# Altium PCB photo_frame-v1.0.PcbDoc (part 5 of 5)
Units mil, origin at the board's own origin, x right, y up, seen from the top; angles counter-clockwise.
Board outline 27716.54 x 14566.93 mil, 2 copper layers (Top Layer, Bottom Layer), stack 61.811 mil thick; 261 components, 231 nets, 1061 pads, 959 vias.
Unrouted connection lines stored in the file: 10.
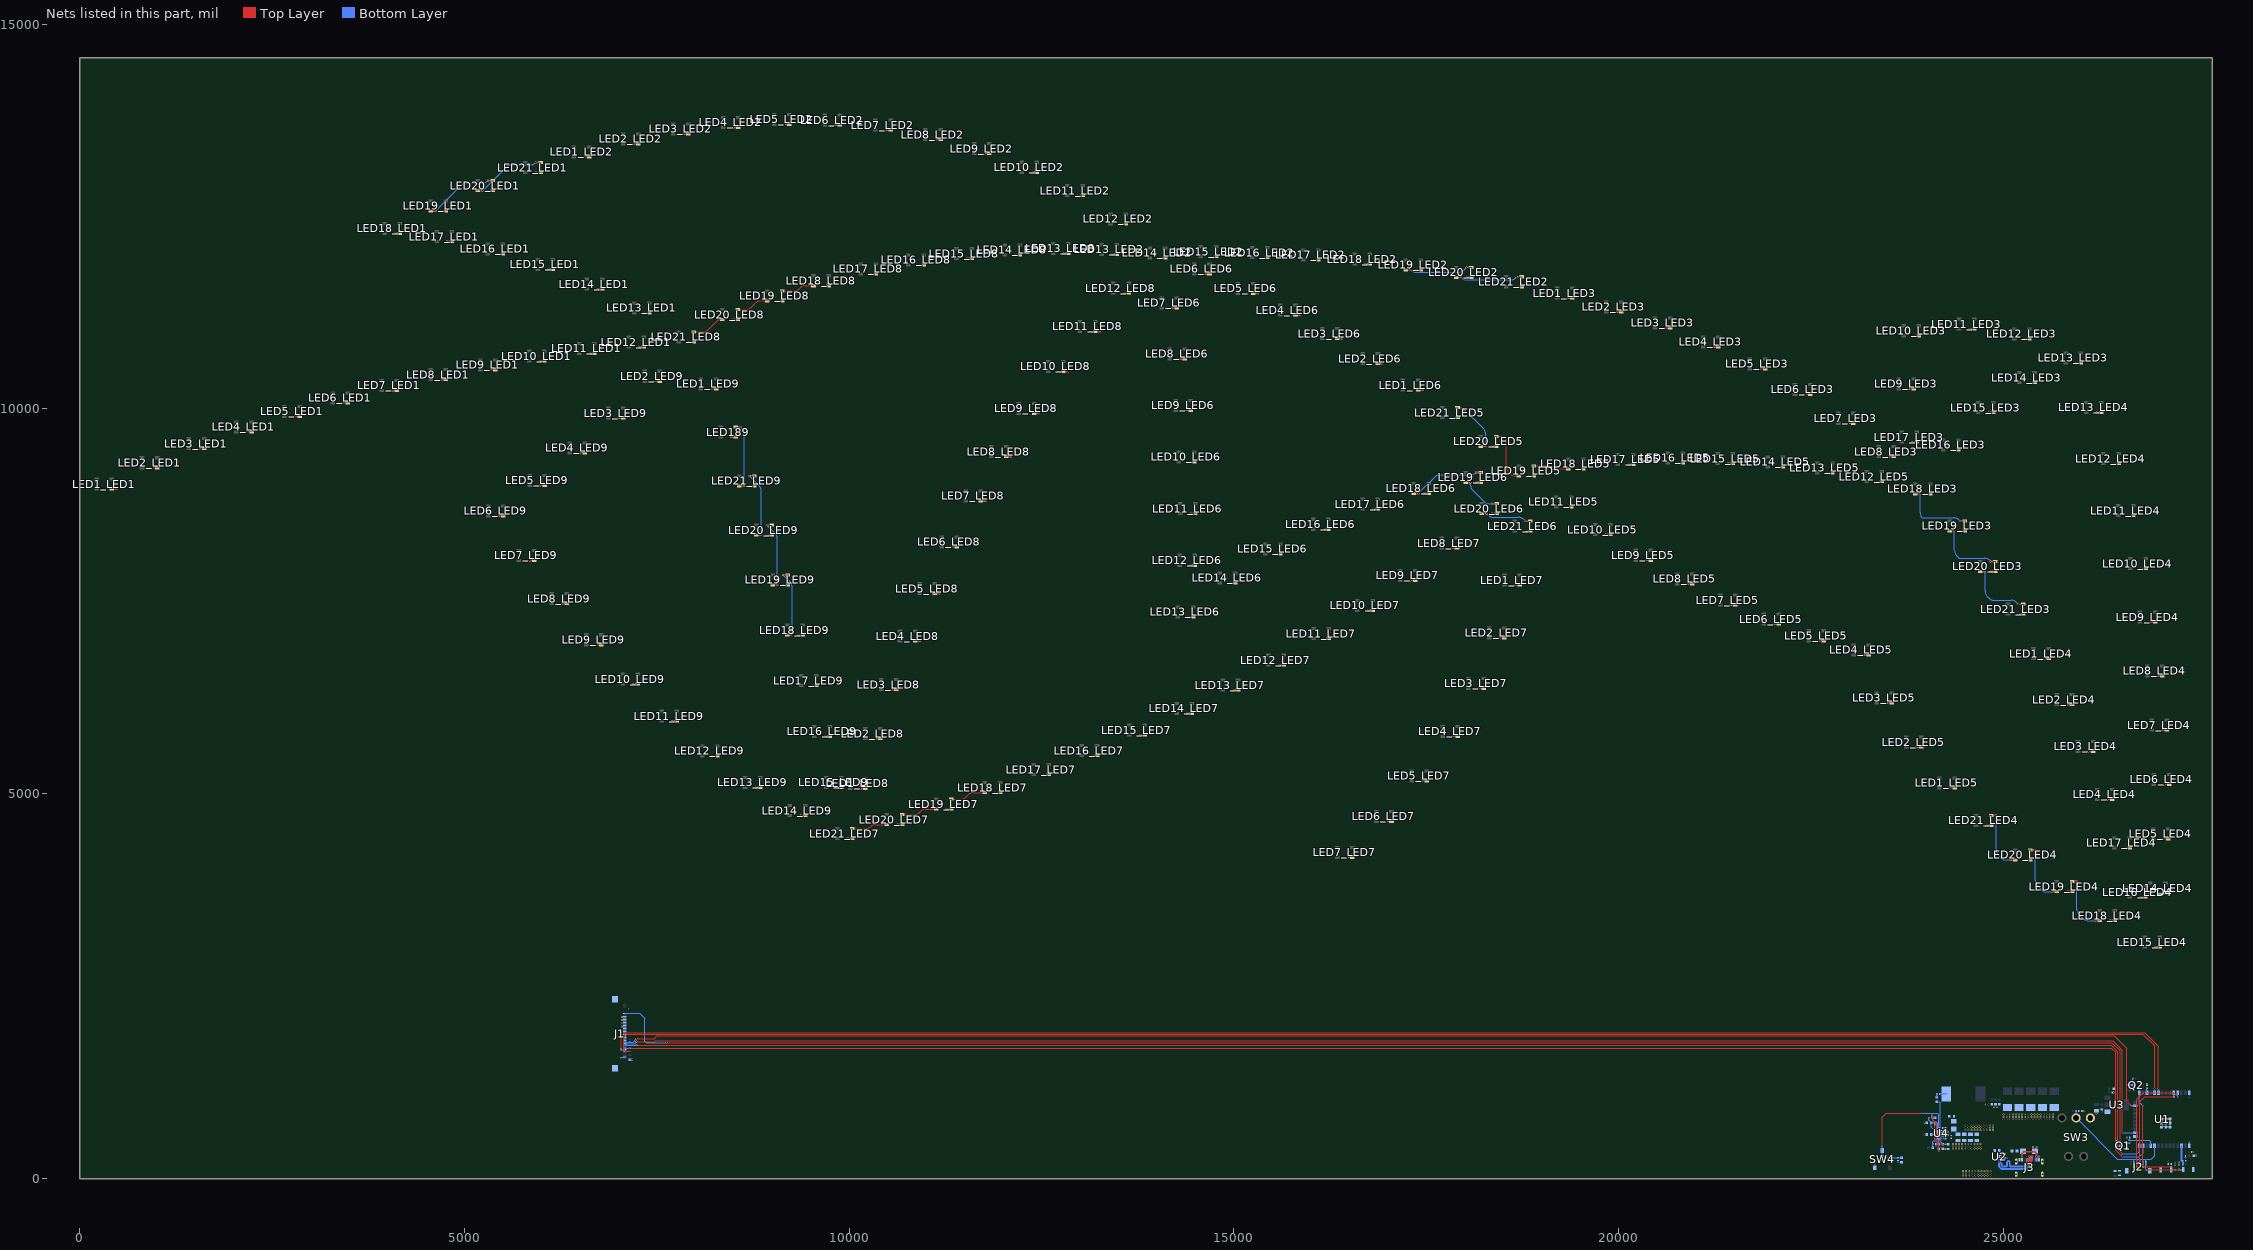
[diagram p4: the nets of this part, all layers, seen from the top]

## Via types
v1: diameter 23.62, hole 11.81, Top Layer to Bottom Layer, tented both sides, 729 vias
v2: diameter 23.62, hole 11.81, Top Layer to Bottom Layer, 230 vias

## Nets (pads, with @x,y where several pads share a name; then routed paths per layer and width w, separated by ;. In a path a pad name is that pad's centre, name@x,y a point inside that pad or via, vN(x,y) a via of type N, cw(c..) or ccw(c..) an arc to the next point about the centre after c; other vN are vias at no path point) (continued)
DOUT18_LED3: LED18_LED3.2 LED19_LED3.4 | length 946.3
  Top Layer w22: LED18_LED3.2@23853.45,8897.97 v1@23916.27,8897.97 ; v1@24435.36,8547.17 LED19_LED3.4@24498.18,8547.17
  Bottom Layer w12: v1(23916.27,8897.83) 23916.27,8649.29 ccw(c23997.29,8649.29) 23916.62,8641.76 ccw(c23997.29,8649.29) 23940,8592 ccw(c23959.31,8611.31) 23959.31,8584 24356.98,8584 cw(c24356.98,8484) 24427.69,8554.71 v1(24435.36,8547.04)
DOUT18_LED4: LED18_LED4.2 LED19_LED4.4 | length 798.1
  Top Layer w22: LED19_LED4.4@25892.06,3858.91 v1@25954.88,3858.91 ; v1@26189.89,3351.96 LED18_LED4.2@26252.71,3351.96
  Bottom Layer w12: v1(25954.88,3859.04) 25954.88,3497.54 ccw(c26054.88,3497.54) 25984.17,3426.83 26029.62,3381.38 ccw(c26100.33,3452.09) 26100.33,3352.09 v1(26189.89,3352.09)
DOUT18_LED5: LED18_LED5.2 LED19_LED5.4 | length 454.8
  Top Layer w12: LED19_LED5.4@18897.68,9260.08 19056.1,9260.08 cw(c19056.1,9188.1) 19107,9239 ccw(c19146.24,9278.24) 19146.24,9222.75 LED18_LED5.2@19342.46,9222.75
DOUT18_LED6: LED18_LED6.2 LED19_LED6.4 | length 976.3
  Top Layer w22: LED18_LED6.2@17335.69,8902.3 v1@17398.51,8902.3 ; v1@18144.72,9175.22 LED19_LED6.4@18207.54,9175.22
  Bottom Layer w12: v1(17398.51,8902.17) 17609.32,9112.97 cw(c17680.03,9042.26) 17680.03,9142.26 18070.47,9142.26 ccw(c18070.47,9242.26) 18141.19,9171.55 v1(18144.72,9175.09)
DOUT18_LED7: LED18_LED7.2 LED19_LED7.4 | length 464.2
  Top Layer w12: LED19_LED7.4@11328.54,4930.22 11459.59,4930.22 ccw(c11459.59,5011.41) 11463.16,4930.3 ccw(c11459.59,5011.41) 11517,4954 11548.01,4985.01 cw(c11618.72,4914.3) 11618.72,5014.3 LED18_LED7.2@11765.69,5014.3
DOUT18_LED8: LED18_LED8.2 LED19_LED8.4 | length 427.2
  Top Layer w12: LED19_LED8.4@9133.54,11533.22 9311.05,11533.22 ccw(c9311.05,11552.95) 9325,11539 9358.01,11572.01 cw(c9428.72,11501.3) 9428.72,11601.3 LED18_LED8.2@9537.69,11601.3
DOUT18_LED9: LED18_LED9.2 LED19_LED9.4 | length 955.6
  Top Layer w22: v1@9140.72,7844.22 LED19_LED9.4@9203.54,7844.22 ; LED18_LED9.2@9198.69,7060.3 v1@9261.51,7060.3
  Bottom Layer w12: v1(9140.72,7844.35) 9232.22,7752.85 cw(c9161.51,7682.14) 9261.51,7682.14 v1(9261.51,7060.17)
DOUT19_LED1: LED19_LED1.2 LED20_LED1.4 | length 961.6
  Top Layer w22: LED19_LED1.2@4564.68,12573.27 v1@4627.5,12573.27 ; v1@5309,12966.98 LED20_LED1.4@5371.82,12966.98
  Bottom Layer w12: v1(4627.5,12573.4) 4959.06,12904.97 cw(c5029.77,12834.26) 5029.77,12934.26 5234.72,12934.26 ccw(c5234.72,13034.26) 5305.43,12963.55 v1(5309,12967.12)
DOUT19_LED2: LED19_LED2.2 LED20_LED2.4 | length 888
  Top Layer w22: LED19_LED2.2@17231.17,11808.07 v1@17293.99,11808.07 ; v1@18024.83,11840.94 LED20_LED2.4@18087.65,11840.94
  Bottom Layer w12: v1(17293.99,11808.2) 17296.64,11805.55 ccw(c17367.35,11876.26) 17367.35,11776.26 17918.6,11776.26 ccw(c17918.6,11876.26) 17989.31,11805.55 v1(18024.83,11841.07)
DOUT19_LED3: LED19_LED3.2 LED20_LED3.4 | length 924.2
  Top Layer w22: LED19_LED3.2@24301.33,8417.25 v1@24364.15,8417.25 ; v1@24833.96,8018.87 LED20_LED3.4@24896.78,8018.87
  Bottom Layer w12: v1(24364.15,8417.12) 24364.15,8161.27 ccw(c24464.15,8161.27) 24384.28,8101.09 ccw(c24464.15,8161.27) 24393.44,8090.56 24411,8073 ccw(c24439.97,8101.97) 24439.97,8061 24750.27,8061 cw(c24750.27,7961) 24820.98,8031.71 v1(24833.96,8018.74)
DOUT19_LED4: LED19_LED4.2 LED20_LED4.4 | length 818.1
  Top Layer w22: LED20_LED4.4@25351.62,4270.24 v1@25414.44,4270.24 ; v1@25632.39,3728.99 LED19_LED4.2@25695.21,3728.99
  Bottom Layer w12: v1(25414.44,4270.37) 25414.44,3874.98 ccw(c25514.44,3874.98) 25443.73,3804.27 25510.31,3737.69 ccw(c25531,3758.39) 25531,3729.12 v1(25632.39,3729.12)
DOUT19_LED5: LED19_LED5.2 LED20_LED5.4 | length 726.3
  Top Layer w12: LED20_LED5.4@18407.97,9644.26 18482.75,9644.26 cw(c18482.75,9588.75) 18522,9628 cw(c18476.13,9582.13) 18541,9582.13 18541,9250.42 ccw(c18641,9250.42) 18570.29,9179.71 18590.55,9159.45 ccw(c18661.26,9230.16) 18661.26,9130.16 LED19_LED5.2@18700.83,9130.16
DOUT19_LED6: LED19_LED6.2 LED20_LED6.4 | length 554.2
  Top Layer w22: LED19_LED6.2@18010.69,9045.3 v1@18073.51,9045.3 ; v1@18354.72,8770.22 LED20_LED6.4@18417.54,8770.22
  Bottom Layer w12: v1(18073.51,9045.17) 18073.51,9014.91 ccw(c18173.51,9014.91) 18102.8,8944.2 18247.62,8799.38 ccw(c18318.33,8870.09) 18318.33,8770.09 v1(18354.72,8770.09)
DOUT19_LED7: LED19_LED7.2 LED20_LED7.4 | length 463.6
  Top Layer w12: LED20_LED7.4@10688.54,4730.22 10846.8,4730.22 ccw(c10846.8,4830.22) 10917.51,4759.51 10929.01,4771.01 cw(c10999.72,4700.3) 10999.72,4800.3 LED19_LED7.2@11131.69,4800.3
DOUT19_LED8: LED19_LED8.2 LED20_LED8.4 | length 423.6
  Top Layer w12: LED20_LED8.4@8550.54,11292.22 8656.8,11292.22 ccw(c8656.8,11392.22) 8727.51,11321.51 8780.01,11374.01 cw(c8850.72,11303.3) 8850.72,11403.3 LED19_LED8.2@8936.69,11403.3
DOUT19_LED9: LED19_LED9.2 LED20_LED9.4 | length 955.2
  Top Layer w22: v1@8929.72,8490.22 LED20_LED9.4@8992.54,8490.22 ; LED19_LED9.2@9006.69,7714.3 v1@9069.51,7714.3
  Bottom Layer w12: v1(8929.72,8490.35) 9040.22,8379.85 cw(c8969.51,8309.14) 9069.51,8309.14 v1(9069.51,7714.43)
DOUT20_LED1: LED20_LED1.2 LED21_LED1.4 | length 958.2
  Top Layer w22: LED20_LED1.2@5174.97,12837.06 v1@5237.79,12837.06 ; v1@5927.72,13202.22 LED21_LED1.4@5990.54,13202.22
  Bottom Layer w12: v1(5237.79,12837.2) 5542.57,13141.97 cw(c5613.28,13071.26) 5613.28,13171.26 5855.47,13171.26 ccw(c5855.47,13271.26) 5923.05,13197.54 ccw(c5855.47,13271.26) 5926.19,13200.55 v1(5927.72,13202.09)
  Bottom Layer w22: v1@5927.66,13202.15 v1@5927.72,13202.22
DOUT20_LED2: LED20_LED2.2 LED21_LED2.4 | length 870
  Top Layer w22: LED20_LED2.2@17890.8,11711.02 v1@17953.62,11711.02 ; v1@18675.3,11718.18 LED21_LED2.4@18738.12,11718.18
  Bottom Layer w12: v1(17953.62,11711.15) 17958.48,11706.29 ccw(c18029.19,11777) 18029.19,11677 18592.56,11677 ccw(c18592.56,11777) 18663.27,11706.29 v1(18675.3,11718.31)
DOUT20_LED3: LED20_LED3.2 LED21_LED3.4 | length 894.9
  Top Layer w22: LED20_LED3.2@24699.93,7888.95 v1@24762.75,7888.95 ; v1@25193.88,7462.96 LED21_LED3.4@25256.7,7462.96
  Bottom Layer w12: v1(24762.75,7888.82) 24762.75,7633.01 ccw(c24862.75,7633.01) 24792.04,7562.3 24813.98,7540.36 ccw(c24876.99,7603.37) 24876.99,7514.26 25101.02,7514.26 cw(c25101.02,7414.26) 25165.95,7490.32 cw(c25101.02,7414.26) 25171.73,7484.97 v1(25193.88,7462.82)
DOUT20_LED4: LED20_LED4.2 LED21_LED4.4 | length 829.5
  Top Layer w22: LED21_LED4.4@24840.85,4718.97 v1@24903.67,4718.97 ; v1@25091.95,4140.31 LED20_LED4.2@25154.77,4140.31
  Bottom Layer w12: v1(24903.67,4719.1) 24903.67,4277.76 ccw(c25003.67,4277.76) 24932.96,4207.05 24981.6,4158.4 ccw(c25024.94,4201.74) 25024.94,4140.45 v1(25091.95,4140.45)
DOUT20_LED5: LED20_LED5.2 LED21_LED5.4 | length 750.5
  Top Layer w22: LED21_LED5.4@17905.83,10017 v1@17968.65,10017 ; LED20_LED5.2@18211.12,9514.34 v1@18273.94,9514.34
  Bottom Layer w12: v1(17968.65,10017.14) 18244.65,9741.14 cw(c18173.94,9670.42) 18273.94,9670.42 v1(18273.94,9514.47)
DOUT20_LED6: LED20_LED6.2 LED21_LED6.4 | length 660.9
  Top Layer w22: LED20_LED6.2@18220.69,8640.3 v1@18283.51,8640.3 ; v1@18786.72,8542.22 LED21_LED6.4@18849.54,8542.22
  Bottom Layer w12: v1(18283.51,8640.17) 18300.39,8623.29 ccw(c18371.1,8694) 18371.1,8594 18693.39,8594 cw(c18693.39,8494) 18764.1,8564.71 v1(18786.72,8542.09)
DOUT20_LED7: LED20_LED7.2 LED21_LED7.4 | length 463.8
  Top Layer w12: LED21_LED7.4@10041.74,4548.53 10223.33,4548.53 ccw(c10223.33,4628.67) 10280,4572 cw(c10348.32,4503.68) 10348.32,4600.3 LED20_LED7.2@10491.69,4600.3
DOUT20_LED8: LED20_LED8.2 LED21_LED8.4 | length 427.9
  Top Layer w12: LED21_LED8.4@7983.54,11002.22 8099.8,11002.22 ccw(c8099.8,11102.22) 8170.51,11031.51 8272.01,11133.01 cw(c8342.72,11062.3) 8342.72,11162.3 LED20_LED8.2@8353.69,11162.3
DOUT20_LED9: LED20_LED9.2 LED21_LED9.4 | length 955.3
  Top Layer w22: v1@8705.72,9131.22 LED21_LED9.4@8768.54,9131.22 ; LED20_LED9.2@8795.69,8360.3 v1@8858.51,8360.3
  Bottom Layer w12: v1(8705.72,9131.09) 8829.22,9007.59 cw(c8758.51,8936.88) 8858.51,8936.88 v1(8858.51,8360.43)
DOUT21_LED9: LED21_LED9.2 LED189.4 | length 902.7
  Top Layer w22: LED189.4@8529.54,9765.22 v1@8592.36,9765.22 ; LED21_LED9.2@8571.69,9001.3 v1@8634.51,9001.3
  Bottom Layer w12: v1(8592.36,9765.09) 8605.22,9752.23 cw(c8534.51,9681.52) 8634.51,9681.52 v1(8634.51,9001.17)
ESP_EN: C3.2 D2.2 J2.6 R1.2 SW1.2 U1.3 | length 803.6
  Top Layer w12: v1(26853.12,115.26) v1(27309.48,115.26)
  Bottom Layer w12: v1@26852.49,115.26 J2.6@26852.49,202.26
  Bottom Layer w22: U1.3@27314.7,425.19 27314.7,227.68 27334.12,208.26 27334.12,177.26 27331.12,174.26
GND: C1.1 C2.1 C3.1 C4.1 C5.1 C6.1 C7.2 C9.1 C10.1 C11.1 C12.1 C13.1 C14.1 C15.1 C16.1 C17.2 C18.1 C20.2 C21.2 C22.2 C23.2 C24.2 C25.1 C26.1 C27.1 C29.2 D1.1 D2.1 D3.1 D4.1 J1.5 J1.16 J1.17 J1.18 J1.19 J1.20 J1.21 J1.22 J1.23 J1.24 J1.25 J1.26 J1.27 J1.28 J1.29 J1.30 J1.31 J1.32 J1.37 J1.MP1 J1.MP2 J2.2 J2.MP1 J2.MP2 J3.A1/B12 J3.B1/A12 J3.S1 J3.S2 J3.S3 J3.S4 LED1_LED1.3 LED1_LED2.3 LED1_LED3.3 LED1_LED4.3 LED1_LED5.3 LED1_LED6.3 LED1_LED7.3 LED1_LED8.3 LED1_LED9.3 LED2_LED1.3 LED2_LED2.3 LED2_LED3.3 LED2_LED4.3 LED2_LED5.3 LED2_LED6.3 LED2_LED7.3 LED2_LED8.3 LED2_LED9.3 LED3_LED1.3 LED3_LED2.3 LED3_LED3.3 LED3_LED4.3 LED3_LED5.3 LED3_LED6.3 LED3_LED7.3 LED3_LED8.3 LED3_LED9.3 LED4_LED1.3 LED4_LED2.3 LED4_LED3.3 LED4_LED4.3 LED4_LED5.3 LED4_LED6.3 LED4_LED7.3 LED4_LED8.3 LED4_LED9.3 LED5_LED1.3 LED5_LED2.3 LED5_LED3.3 LED5_LED4.3 LED5_LED5.3 LED5_LED6.3 LED5_LED7.3 LED5_LED8.3 LED5_LED9.3 LED6_LED1.3 LED6_LED2.3 LED6_LED3.3 LED6_LED4.3 LED6_LED5.3 LED6_LED6.3 LED6_LED7.3 LED6_LED8.3 LED6_LED9.3 LED7_LED1.3 LED7_LED2.3 LED7_LED3.3 LED7_LED4.3 LED7_LED5.3 LED7_LED6.3 LED7_LED7.3 LED7_LED8.3 LED7_LED9.3 LED8_LED1.3 LED8_LED2.3 LED8_LED3.3 LED8_LED4.3 LED8_LED5.3 LED8_LED6.3 LED8_LED7.3 LED8_LED8.3 LED8_LED9.3 LED9_LED1.3 LED9_LED2.3 LED9_LED3.3 LED9_LED4.3 LED9_LED5.3 LED9_LED6.3 LED9_LED7.3 LED9_LED8.3 LED9_LED9.3 LED10_LED1.3 LED10_LED2.3 LED10_LED3.3 LED10_LED4.3 LED10_LED5.3 LED10_LED6.3 LED10_LED7.3 LED10_LED8.3 LED10_LED9.3 LED11_LED1.3 LED11_LED2.3 LED11_LED3.3 LED11_LED4.3 LED11_LED5.3 LED11_LED6.3 LED11_LED7.3 LED11_LED8.3 LED11_LED9.3 LED12_LED1.3 LED12_LED2.3 LED12_LED3.3 LED12_LED4.3 LED12_LED5.3 LED12_LED6.3 LED12_LED7.3 LED12_LED8.3 LED12_LED9.3 LED13_LED1.3 LED13_LED2.3 LED13_LED3.3 LED13_LED4.3 LED13_LED5.3 LED13_LED6.3 LED13_LED7.3 LED13_LED8.3 LED13_LED9.3 LED14_LED1.3 LED14_LED2.3 LED14_LED3.3 LED14_LED4.3 LED14_LED5.3 LED14_LED6.3 LED14_LED7.3 LED14_LED8.3 LED14_LED9.3 LED15_LED1.3 LED15_LED2.3 LED15_LED3.3 LED15_LED4.3 LED15_LED5.3 LED15_LED6.3 LED15_LED7.3 LED15_LED8.3 LED15_LED9.3 LED16_LED1.3 LED16_LED2.3 LED16_LED3.3 LED16_LED4.3 LED16_LED5.3 LED16_LED6.3 LED16_LED7.3 LED16_LED8.3 LED16_LED9.3 LED17_LED1.3 LED17_LED2.3 LED17_LED3.3 LED17_LED4.3 LED17_LED5.3 LED17_LED6.3 LED17_LED7.3 LED17_LED8.3 LED17_LED9.3 LED18_LED1.3 LED18_LED2.3 LED18_LED3.3 LED18_LED4.3 LED18_LED5.3 LED18_LED6.3 LED18_LED7.3 LED18_LED8.3 LED18_LED9.3 LED19_LED1.3 LED19_LED2.3 LED19_LED3.3 LED19_LED4.3 LED19_LED5.3 LED19_LED6.3 LED19_LED7.3 LED19_LED8.3 LED19_LED9.3 LED20_LED1.3 LED20_LED2.3 LED20_LED3.3 LED20_LED4.3 LED20_LED5.3 LED20_LED6.3 LED20_LED7.3 LED20_LED8.3 LED20_LED9.3 LED21_LED1.3 LED21_LED2.3 LED21_LED3.3 LED21_LED4.3 LED21_LED5.3 LED21_LED6.3 LED21_LED7.3 LED21_LED8.3 LED21_LED9.3 LED189.3 LED224.2 Q1.2 R3.2 R7.2 R9.2 R12.1 R15.1 R16.1 R18.2 R22.1 SW1.1 SW2.1 SW3.3 SW4.3 U1.1 U1.15 U1.38 U1.39 U1.39_10 U1.39_11 U1.39_12 U1.39_13 U1.39_14 U1.39_15 U1.39_16 U1.39_17 U1.39_18 U1.39_19 U1.39_20 U1.39_21 U1.40 U1.41 U1.42 U1.43 U1.44 U1.45 U1.46 U1.47 U2.7 U3.1 U4.10 U4.11 U4.12 U4.13 U4.14 U4.22 U4.27 U4.28 U4.29 | length 12248.1
  Top Layer w22: LED1_LED1.3@420.79,8958.47 v1@483.61,8958.47 ; v1@945.72,9236.3 LED2_LED1.3@1008.54,9236.3 ; v1@1554.93,9484.35 LED3_LED1.3@1617.75,9484.35 ; v1@2172.72,9703.3 LED4_LED1.3@2235.54,9703.3 ; v1@2796.72,9904.3 LED5_LED1.3@2859.54,9904.3 ; v1@3423.72,10080.3 LED6_LED1.3@3486.54,10080.3 ; v1@4061.72,10240.3 LED7_LED1.3@4124.54,10240.3 ; v1@4097.39,12283.05 LED18_LED1.3@4160.21,12283.05 ; v1@4696.72,10382.3 LED8_LED1.3@4759.54,10382.3 ; v1@4698.71,12573.27 LED19_LED1.3@4761.53,12573.27 ; v1@4773.87,12175.92 LED17_LED1.3@4836.69,12175.92 ; v1@5309,12837.06 LED20_LED1.3@5371.82,12837.06 ; v1@5339.27,10508.98 LED9_LED1.3@5402.09,10508.98 ; v1@5435.83,12016.81 LED16_LED1.3@5498.65,12016.81 ; v1@5442.72,8610.3 LED6_LED9.3@5505.54,8610.3 ; v1@5843.72,8031.3 LED7_LED9.3@5906.54,8031.3 ; v1@5927.72,13072.3 LED21_LED1.3@5990.54,13072.3 ; v1@5978.72,10623.3 LED10_LED1.3@6041.54,10623.3 ; v1@5982.72,9007.3 LED5_LED9.3@6045.54,9007.3 ; v1@6089.11,11814.2 LED15_LED1.3@6151.93,11814.2 ; v1@6268.72,7472.3 LED8_LED9.3@6331.54,7472.3 ; v1@6502.72,9429.3 LED4_LED9.3@6565.54,9429.3 ; v1@6558.72,13276.3 LED1_LED2.3@6621.54,13276.3 ; v1@6624.72,10721.3 LED11_LED1.3@6687.54,10721.3 ; v1@6716.72,6936.3 LED9_LED9.3@6779.54,6936.3 ; v1@6726.85,11558.01 LED14_LED1.3@6789.67,11558.01 ; v1@7003.72,9881.3 LED3_LED9.3@7066.54,9881.3 ; v1@7191.72,6425.3 LED10_LED9.3@7254.54,6425.3 ; v1@7197.72,13445.3 LED2_LED2.3@7260.54,13445.3 ; v1@7271.02,10805.09 LED12_LED1.3@7333.84,10805.09 ; v1@7341.37,11247.98 LED13_LED1.3@7404.19,11247.98 ; v1@7476.72,10360.3 LED2_LED9.3@7539.54,10360.3 ; v1@7697.72,5944.3 LED11_LED9.3@7760.54,5944.3 ; v1@7847.72,13573.3 LED3_LED2.3@7910.54,13573.3 ; v1@7920.72,10872.3 LED21_LED8.3@7983.54,10872.3 ; v1@8208.72,10261.3 LED1_LED9.3@8271.54,10261.3 ; v1@8223.72,5493.3 LED12_LED9.3@8286.54,5493.3 ; v1@8466.72,9635.3 LED189.3@8529.54,9635.3 ; v1@8487.72,11162.3 LED20_LED8.3@8550.54,11162.3 ; v1@8499.72,13658.3 LED4_LED2.3@8562.54,13658.3 ; v1@8705.72,9001.3 LED21_LED9.3@8768.54,9001.3 ; v1@8781.72,5082.3 LED13_LED9.3@8844.54,5082.3 ; v1@8929.72,8360.3 LED20_LED9.3@8992.54,8360.3 ; v1@9070.72,11403.3 LED19_LED8.3@9133.54,11403.3 ; v1@9140.72,7714.3 LED19_LED9.3@9203.54,7714.3 ; v1@9158.72,13699.3 LED5_LED2.3@9221.54,13699.3 ; v1@9332.72,7060.3 LED18_LED9.3@9395.54,7060.3 ; v1@9364.72,4716.3 LED14_LED9.3@9427.54,4716.3 ; v1@9512.3,6404.34 LED17_LED9.3@9575.12,6404.34 ; v1@9671.72,11601.3 LED18_LED8.3@9734.54,11601.3 ; v1@9684.01,5745.99 LED16_LED9.3@9746.83,5745.99 ; v1@9816.72,13688.3 LED6_LED2.3@9879.54,13688.3 ; v1@9835.38,5081.81 LED15_LED9.3@9898.2,5081.81 ; v1@9978.92,4418.6 LED21_LED7.3@10041.74,4418.6 ; v1@10149.72,5069.3 LED1_LED8.3@10212.54,5069.3 ; v1@10285.72,11754.3 LED17_LED8.3@10348.54,11754.3 ; v1@10342.72,5716.3 LED2_LED8.3@10405.54,5716.3 ; v1@10475.72,13623.3 LED7_LED2.3@10538.54,13623.3 ; v1@10551.72,6354.3 LED3_LED8.3@10614.54,6354.3 ; v1@10625.72,4600.3 LED20_LED7.3@10688.54,4600.3 ; LED4_LED8.3@10858.54,6983.3 v1@10921.36,6983.3 ; v1@10905.15,11872.26 LED16_LED8.3@10967.97,11872.26 ; LED5_LED8.3@11113.54,7601.3 v1@11176.36,7601.3 ; v1@11125.72,13500.3 LED8_LED2.3@11188.54,13500.3 ; v1@11265.72,4800.3 LED19_LED7.3@11328.54,4800.3 ; v1@11337.72,8209.3 LED6_LED8.3@11400.54,8209.3 ; v1@11529.72,11954.3 LED15_LED8.3@11592.54,11954.3 ; LED7_LED8.3@11710.54,8804.3 v1@11773.36,8804.3 ; v1@11760.72,13318.3 LED9_LED2.3@11823.54,13318.3 ; v1@11899.72,5014.3 LED18_LED7.3@11962.54,5014.3 ; LED8_LED8.3@12042.54,9381.3 v1@12105.36,9381.3 ; v1@12157.72,12003.3 LED14_LED8.3@12220.54,12003.3 ; v1@12378.72,13076.3 LED10_LED2.3@12441.54,13076.3 ; LED9_LED8.3@12403.54,9944.3 v1@12466.36,9944.3 ; v1@12532.72,5247.3 LED17_LED7.3@12595.54,5247.3 ; LED10_LED8.3@12784.54,10487.3 v1@12847.36,10487.3 ; v1@12787.3,12022.34 LED13_LED8.3@12850.12,12022.34 ; v1@12971.72,12772.3 LED11_LED2.3@13034.54,12772.3 ; v1@13158.72,5494.3 LED16_LED7.3@13221.54,5494.3 ; LED11_LED8.3@13196.54,11008.3 v1@13259.36,11008.3 ; v1@13415.72,12009.3 LED13_LED2.3@13478.54,12009.3 ; v1@13530.72,12404.3 LED12_LED2.3@13593.54,12404.3 ; v1@13568.72,11504.3 LED12_LED8.3@13631.54,11504.3 ; v1@13776.72,5762.3 LED15_LED7.3@13839.54,5762.3 ; v1@14042.3,11963.26 LED14_LED2.3@14105.12,11963.26 ; v1@14196.94,11312.45 LED7_LED6.3@14259.76,11312.45 ; v1@14300.72,10650.3 LED8_LED6.3@14363.54,10650.3 ; v1@14376.3,9983.26 LED9_LED6.3@14439.12,9983.26 ; v1@14391.72,6044.3 LED14_LED7.3@14454.54,6044.3 ; v1@14406.72,7298.3 LED13_LED6.3@14469.54,7298.3 ; v1@14419.72,9313.3 LED10_LED6.3@14482.54,9313.3 ; v1@14430.3,7969.34 LED12_LED6.3@14493.12,7969.34 ; v1@14436.72,8641.3 LED11_LED6.3@14499.54,8641.3 ; v1@14620.85,11754.48 LED6_LED6.3@14683.67,11754.48 ; v1@14706.69,11978.8 LED15_LED2.3@14769.51,11978.8 ; v1@14951.72,7739.3 LED14_LED6.3@15014.54,7739.3 ; v1@14991.15,6348.26 LED13_LED7.3@15053.97,6348.26 ; LED5_LED6.3@15249.93,11502.56 v1@15312.75,11502.56 ; v1@15373.43,11966.3 LED16_LED2.3@15436.25,11966.3 ; v1@15541.72,8118.3 LED15_LED6.3@15604.54,8118.3 ; v1@15582.72,6672.3 LED12_LED7.3@15645.54,6672.3 ; LED4_LED6.3@15800.85,11219.55 v1@15863.67,11219.55 ; v1@16036.51,11936.8 LED17_LED2.3@16099.33,11936.8 ; v1@16162.72,8437.3 LED16_LED6.3@16225.54,8437.3 ; v1@16169.72,7015.3 LED11_LED7.3@16232.54,7015.3 ; LED3_LED6.3@16343.84,10913.75 v1@16406.66,10913.75 ; v1@16475.72,4174.3 LED7_LED7.3@16538.54,4174.3 ; v1@16702.12,11883.41 LED18_LED2.3@16764.94,11883.41 ; v1@16739.72,7383.3 LED10_LED7.3@16802.54,7383.3 ; v1@16808.72,8698.3 LED17_LED6.3@16871.54,8698.3 ; LED2_LED6.3@16872.87,10588.1 v1@16935.69,10588.1 ; v1@16985.72,4642.3 LED6_LED7.3@17048.54,4642.3 ; v1@17295.72,7773.3 LED9_LED7.3@17358.54,7773.3 ; v1@17365.2,11808.07 LED19_LED2.3@17428.02,11808.07 ; LED1_LED6.3@17393.89,10245.22 v1@17456.71,10245.22 ; v1@17445.72,5168.3 LED5_LED7.3@17508.54,5168.3 ; v1@17469.72,8902.3 LED18_LED6.3@17532.54,8902.3 ; v1@17836.72,8191.3 LED8_LED7.3@17899.54,8191.3 ; v1@17843.01,9887.08 LED21_LED5.3@17905.83,9887.08 ; v1@17848.72,5746.3 LED4_LED7.3@17911.54,5746.3 ; v1@18024.83,11711.02 LED20_LED2.3@18087.65,11711.02 ; v1@18144.72,9045.3 LED19_LED6.3@18207.54,9045.3 ; v1@18182.72,6369.3 LED3_LED7.3@18245.54,6369.3 ; v1@18345.15,9514.34 LED20_LED5.3@18407.97,9514.34 ; v1@18354.72,8640.3 LED20_LED6.3@18417.54,8640.3 ; v1@18452.72,7026.3 LED2_LED7.3@18515.54,7026.3 ; v1@18650.72,7710.3 LED1_LED7.3@18713.54,7710.3 ; v1@18675.3,11588.26 LED21_LED2.3@18738.12,11588.26 ; v1@18786.72,8412.3 LED21_LED6.3@18849.54,8412.3 ; v1@18834.86,9130.16 LED19_LED5.3@18897.68,9130.16 ; v1@19320.72,8729.3 LED11_LED5.3@19383.54,8729.3 ; v1@19333.72,11440.3 LED1_LED3.3@19396.54,11440.3 ; v1@19476.49,9222.75 LED18_LED5.3@19539.31,9222.75 ; v1@19827.72,8368.3 LED10_LED5.3@19890.54,8368.3 ; v1@19973.72,11261.3 LED2_LED3.3@20036.54,11261.3 ; v1@20125.41,9278.78 LED17_LED5.3@20188.23,9278.78 ; v1@20353.72,8034.3 LED9_LED5.3@20416.54,8034.3 ; v1@20606.72,11053.3 LED3_LED3.3@20669.54,11053.3 ; v1@20781.3,9299.26 LED16_LED5.3@20844.12,9299.26 ; v1@20895.72,7727.3 LED8_LED5.3@20958.54,7727.3 ; v1@21230.72,10806.3 LED4_LED3.3@21293.54,10806.3 ; v1@21421.04,9291.3 LED15_LED5.3@21483.86,9291.3 ; v1@21452.72,7451.3 LED7_LED5.3@21515.54,7451.3 ; v1@21839.72,10521.3 LED5_LED3.3@21902.54,10521.3 ; v1@22019.15,7204.34 LED6_LED5.3@22081.97,7204.34 ; v1@22068.98,9249.09 LED14_LED5.3@22131.8,9249.09 ; v1@22425.79,10190.67 LED6_LED3.3@22488.61,10190.67 ; v1@22601.72,6988.3 LED5_LED5.3@22664.54,6988.3 ; v1@22715,9170.09 LED13_LED5.3@22777.82,9170.09 ; v1@22988.34,9814.51 LED7_LED3.3@23051.16,9814.51 ; v1@23186.72,6804.3 LED4_LED5.3@23249.54,6804.3 ; v1@23355.3,9055.34 LED12_LED5.3@23418.12,9055.34 ; v1@23487.72,6181.3 LED3_LED5.3@23550.54,6181.3 ; v1@23511.69,9381.49 LED8_LED3.3@23574.51,9381.49 ; v1@23774.3,10261.19 LED9_LED3.3@23837.12,10261.19 ; v1@23810.79,9569.02 LED17_LED3.3@23873.61,9569.02 ; v1@23837.91,10951.75 LED10_LED3.3@23900.73,10951.75 ; v1@23868.72,5606.3 LED2_LED5.3@23931.54,5606.3 ; v1@23987.48,8897.97 LED18_LED3.3@24050.3,8897.97 ; v1@24302.4,5076.52 LED1_LED5.3@24365.22,5076.52 ; v1@24350.31,9468.2 LED16_LED3.3@24413.13,9468.2 ; v1@24435.36,8417.25 LED19_LED3.3@24498.18,8417.25 ; v1@24556.71,11038.18 LED11_LED3.3@24619.53,11038.18 ; v1@24778.03,4589.04 LED21_LED4.3@24840.85,4589.04 ; v1@24805.28,9953.28 LED15_LED3.3@24868.1,9953.28 ; v1@24833.96,7888.95 LED20_LED3.3@24896.78,7888.95 ; v1@25193.88,7333.03 LED21_LED3.3@25256.7,7333.03 ; v1@25273.83,10912 LED12_LED3.3@25336.65,10912 ; v1@25288.8,4140.31 LED20_LED4.3@25351.62,4140.31 ; v1@25341.17,10341.29 LED14_LED3.3@25403.99,10341.29 ; v1@25525.16,6755.44 LED1_LED4.3@25587.98,6755.44 ; v1@25828.6,6159.2 LED2_LED4.3@25891.42,6159.2 ; v1@25829.24,3728.99 LED19_LED4.3@25892.06,3728.99 ; v1@25941.72,10599.22 LED13_LED3.3@26004.54,10599.22 ; v1@26103.08,5550.32 LED3_LED4.3@26165.9,5550.32 ; v1@26208,9954.64 LED13_LED4.3@26270.82,9954.64 ; v1@26352.17,4927.49 LED4_LED4.3@26414.99,4927.49 ; v1@26386.74,3351.96 LED18_LED4.3@26449.56,3351.96 ; v1@26433.41,9288.86 LED12_LED4.3@26496.23,9288.86 ; v1@26575.58,4297.44 LED17_LED4.3@26638.4,4297.44 ; v1@26623.72,8613.42 LED11_LED4.3@26686.54,8613.42 ; v1@26778.65,3657.07 LED16_LED4.3@26841.47,3657.07 ; v1@26784.36,7925.43 LED10_LED4.3@26847.18,7925.43 ; v1@26908.59,7231.54 LED9_LED4.3@26971.41,7231.54 ; v1@26967.72,3008.3 LED15_LED4.3@27030.54,3008.3 ; v1@27003.91,6531.62 LED8_LED4.3@27066.73,6531.62 ; v1@27043.14,3709.85 LED14_LED4.3@27105.96,3709.85 ; v1@27062.15,5827.55 LED7_LED4.3@27124.97,5827.55 ; v1@27080.99,4414.38 LED5_LED4.3@27143.81,4414.38 ; v1@27090.24,5121.75 LED6_LED4.3@27153.06,5121.75
  Bottom Layer w8: v1(7034,1562) 7048.62,1576.62 J1.5@7093.12,1576.62 ; C7.2@7153,1545 v1(7182,1545) ; v1(23631,212) v1@23631.12,212.12 ; U4.22@24145.13,523.26 24145.13,564.87 24168.78,588.52 U4.29@24192.37,588.52 ; v1(26557,386) 26557.2,386.2 Q1.2@26596,386.2
  Bottom Layer w12: C6.1@25017.12,263.26 25045.26,263.26 v1(25046,264) ; J2.2@26695.01,202.26 26695.01,151.88 v1(26695.45,151.44)
  other v1: 27467.12,180.26 23327.51,188.35 27229.12,205.26 27282.12,207.26 27142.12,220.26 27365,269 24927.49,283.89 24962.49,283.89 25463,285 27502,299 27468,343 24241.76,384.56 25386,408 25430,408 24120,424 27414,470 23971,571 24165,571 24195,571 24225,571 24322,588 24165,611 24195,611 24225,611 23975,726 26211,846 26278,868 26042,878 24877,927 24917,927 24763,964 24803,964 27414.7,1064.43 26428.76,1117.88 26433,1199 26865.12,1230.26 7050,1977 7050,2017.67 7050,2058.33 7050,2099 7138,2207 26967.72,3008.43 26386.74,3351.82 26778.65,3656.94 27043.14,3709.72 25829.24,3728.85 25288.8,4140.18 16475.72,4174.17 26575.58,4297.31 27080.99,4414.25 9978.92,4418.47 24778.03,4588.91 10625.72,4600.17 16985.72,4642.17 9364.72,4716.17 11265.72,4800.17 26352.17,4927.36 11899.72,5014.17 10149.72,5069.17 24302.4,5076.39 9835.38,5081.67 8781.72,5082.17 27090.24,5121.61 17445.72,5168.17 12532.72,5247.17 8223.72,5493.17 13158.72,5494.17 26103.08,5550.19 23868.72,5606.17 10342.72,5716.17 9684.01,5745.85 17848.72,5746.17 13776.72,5762.17 27062.15,5827.42 7697.72,5944.17 14391.72,6044.17 25828.6,6159.07 23487.72,6181.17 14991.15,6348.13 10551.72,6354.17 18182.72,6369.17 9512.3,6404.21 7191.72,6425.17 27003.91,6531.49 15582.72,6672.17 25525.16,6755.31 23186.72,6804.17 6716.72,6936.17 10921.36,6983.43 22601.72,6988.17 16169.72,7015.17 18452.72,7026.17 9332.72,7060.17 22019.15,7204.2 26908.59,7231.41 14406.72,7298.17 25193.88,7332.9 16739.72,7383.17 21452.72,7451.17 6268.72,7472.17 11176.36,7601.43 18650.72,7710.17 9140.72,7714.17 20895.72,7727.17 14951.72,7739.17 17295.72,7773.17 24833.96,7888.82 26784.36,7925.3 14430.3,7969.2 5843.72,8031.17 20353.72,8034.17 15541.72,8118.17 17836.72,8191.17 11337.72,8209.43 8929.72,8360.17 19827.72,8368.17 18786.72,8412.17 24435.36,8417.12 16162.72,8437.17 5442.72,8610.17 26623.72,8613.29 18354.72,8640.17 14436.72,8641.17 16808.72,8698.17 19320.72,8729.17 11773.36,8804.43 23987.48,8897.83 17469.72,8902.17 483.61,8958.34 8705.72,9001.17 5982.72,9007.17 18144.72,9045.17 23355.3,9055.2 18834.86,9130.03 22715,9169.95 19476.49,9222.61 945.72,9236.17 22068.98,9248.96 20125.41,9278.65 26433.41,9288.73 21421.04,9291.17 20781.3,9299.13 14419.72,9313.17 12105.36,9381.43 23511.69,9381.35 6502.72,9429.17 24350.31,9468.07 1554.93,9484.22 18345.15,9514.47 23810.79,9568.89 8466.72,9635.17 2172.72,9703.17 22988.34,9814.37 7003.72,9881.17 17843.01,9887.21 2796.72,9904.17 12466.36,9944.43 24805.28,9953.14 26208,9954.5 14376.3,9983.13 3423.72,10080.17 22425.79,10190.54 4061.72,10240.17 17456.71,10245.36 8208.72,10261.17 23774.3,10261.06 25341.17,10341.15 7476.72,10360.17 4696.72,10382.17 12847.36,10487.17 5339.27,10508.84 21839.72,10521.17 16935.69,10588.23 25941.72,10599.08 5978.72,10623.17 14300.72,10650.17 6624.72,10721.17 7271.02,10804.96 21230.72,10806.17 7920.72,10872.17 25273.83,10911.87 16406.66,10913.88 23837.91,10951.62 13259.36,11008.17 24556.71,11038.05 20606.72,11053.17 8487.72,11162.17 15863.67,11219.68 7341.37,11247.85 19973.72,11261.17 14196.94,11312.32 9070.72,11403.17 19333.72,11440.17 15312.75,11502.69 13568.72,11504.17 6726.85,11557.88 18675.3,11588.13 9671.72,11601.17 18024.83,11710.88 10285.72,11754.17 14620.85,11754.61 17365.2,11807.93 6089.11,11814.07 10905.15,11872.13 16702.12,11883.27 16036.51,11936.67 11529.72,11954.17 14042.3,11963.13 15373.43,11966.17 14706.69,11978.66 12157.72,12003.17 13415.72,12009.17 5435.83,12016.68 12787.3,12022.2 4773.87,12175.78 4097.39,12282.91 13530.72,12404.17 4698.71,12573.14 12971.72,12772.17 5309,12836.93 5927.72,13072.17 12378.72,13076.17 6558.72,13276.17 11760.72,13318.17 7197.72,13445.17 11125.72,13500.17 7847.72,13573.17 10475.72,13623.17 8499.72,13658.17 9816.72,13688.17 9158.72,13699.17
  other v2: 24504,632 24544,632 24584,632 24624,632 24664,632 24704,632 24744,632 24784,632 24824,632 24864,632 24504,662 24544,662 24584,662 24624,662 24664,662 24704,662 24744,662 24784,662 24824,662 24864,662 24504,692 24544,692 24584,692 24624,692 24664,692 24704,692 24744,692 24784,692 24824,692 24864,692 25003,771 25043,771 25083,771 25123,771 25163,771 25203,771 25243,771 25283,771 25323,771 25363,771 25403,771 25443,771 25483,771 25523,771 25563,771 25603,771 25643,771 25003,801 25043,801 25083,801 25123,801 25163,801 25203,801 25243,801 25283,801 25323,801 25363,801 25403,801 25443,801 25483,801 25523,801 25563,801 25603,801 25643,801 25003,831 25043,831 25083,831 25123,831 25163,831 25203,831 25243,831 25283,831 25323,831 25363,831 25403,831 25443,831 25483,831 25523,831 25563,831 25603,831 25643,831
IO0: C4.2 D3.2 J2.5 SW2.2 U1.25 | length 1398.3
  Top Layer w12: v1@26813.56,945.56 v1(26813.56,151.44) v1(27178.84,151.44)
  Bottom Layer w12: U1.25@26764.7,1114.17 26764.7,994.42 v1(26812.86,946.26) ; J2.5@26813.12,202.26 26813.12,151.88 v1(26813.56,151.44)
LED_BCKL: R4.1 R7.1 U1.11 | length 334.4
  Bottom Layer w12: R4.1@26640.12,498.26 26892.12,498.26 26914.7,475.68 U1.11@26914.7,425.19
LED_BRIGHTNESS: R2.2 R3.1 SW3.2 U1.10 | length 1479.8
  Bottom Layer w12: R2.2@25946.12,879.26 25946.12,787.69 SW3.2@25944.73,787.69 26479.43,253 26919,253 26964.7,298.7 U1.10@26964.7,425.19
LED_K: J1.34 J1.35 J1.36 R10.2 | length 21020.2
  Top Layer w12: v1(7626,1764) 26409,1764 26515,1658 v1(26515,485)
  Bottom Layer w12: J1.34@7093.12,2147.47 7279.53,2147.47 7346,2081 7346,1782 7364,1764 v1(7626,1764) ; R10.2@26468.12,483.76 26513.76,483.76 v1(26515,485)
NetC6_2: C6.2 U2.3
NetC19_1: C19.1 R13.2 | length 44
  Bottom Layer w22: R13.2@24133.12,1056.26 C19.1@24133.12,1100.26
NetC19_2: C19.2 C28.2 L1.1 U4.6 U4.7 U4.8 U4.9 | length 86.4
  Bottom Layer w22: C19.2@24172.12,1100.26 24257.12,1100.26 L1.1@24258.12,1099.26
NetC28_1: C28.1 R15.2
NetC29_1: C29.1 R19.1 R21.2 U4.20 | length 672.6
  Top Layer w8: v1(24070,819) 24070,774.26 24132.81,711.45 24132.81,692.55 24132.81,496.19 24182.74,446.26 v1(24242.74,446.26)
  Bottom Layer w8: v1@24069.62,818.62 R21.2@24069.62,788.26 R19.1@24110.12,788.26 ; U4.20@24176.62,523.26 24176.62,481.76 C29.1@24212.12,446.26 v1(24242.74,446.26)
NetLED224_1: LED224.1 R20.2
NetQ1_1: Q1.1 R4.2 | length 44.2
  Bottom Layer w8: Q1.1@26596,461 Q1.1@26596.26,461.26
  Bottom Layer w12: Q1.1@26596.26,461.26 R4.2@26640.12,461.26
NetQ1_3: Q1.3 R10.1 | length 49.2
  Bottom Layer w8: R10.1@26468.12,423.76 R10.1@26468.28,423.6
  Bottom Layer w12: R10.1@26468.28,423.6 Q1.3@26517.26,423.6
NetQ2_3: Q2.3 R6.1 R8.1 | length 137.8
  Bottom Layer w12: Q2.3@26683.75,1214.26 26683.75,1299.89 R6.1@26684.12,1300.26
  Bottom Layer w22: R8.1@26632.12,1214.26 Q2.3@26683.75,1214.26
NetR9_1: R9.1 U1.27 | length 57.8
  Bottom Layer w12: U1.27@26865.12,1114.58 R9.1@26865.12,1171.76
  Bottom Layer w22: U1.27@26864.7,1114.17 U1.27@26865.12,1114.58
NetR13_1: R13.1 U4.4 | length 378.7
  Bottom Layer w8: R13.1@24133.12,996.26 24164.12,996.26 24176.62,983.76 U4.4@24176.62,653.78
NetR14_1: R14.1 R16.2 U4.23 | length 156.8
  Bottom Layer w8: R14.1@24083.12,400.26 R16.2@24083.12,447.26 24083.12,479.12 24095,491 24120,491 24129.38,500.38 U4.23@24129.38,523.26
NetR17_1: R17.1 R19.2 U4.2 | length 528.5
  Top Layer w8: v1(24110,702) 24110,495 24161.12,443.88 v1(24161.12,354.64)
  Bottom Layer w8: v1(24110,702) 24110.12,702.12 R19.2@24110.12,728.26 24134.12,728.26 24145.13,717.25 U4.2@24145.13,653.78 ; v1(24161.12,354.64) R17.1@24161.12,385.26
NetR17_2: R17.2 U4.21 | length 78.1
  Bottom Layer w8: U4.21@24160.87,523.26 24160.87,445.51 R17.2@24161.12,445.26
NetR18_1: R18.1 U4.25 | length 45.5
  Bottom Layer w8: R18.1@24062.12,572.26 24062.63,572.77 U4.25@24107.43,572.77
NetR21_1: R21.1 R22.2 U4.1 | length 204.9
  Bottom Layer w8: R21.1@24032.62,788.26 24032.62,756.76 R22.2@24063.12,726.26 24063.12,668.26 24077.6,653.78 U4.1@24129.38,653.78
ON/OFF_EN: R11.1 R12.2 SW4.2 U4.3 | length 1695.7
  Top Layer w8: v1(23424,420) 23424,797 23475,848 v1(23937,848)
  Bottom Layer w8: v1(23424,420) 23424,307 23459.74,271.26 R12.2@23631.12,271.26 R11.1@23676.12,271.26 ; v1(23937,848) 24138,848 24160.87,825.13 U4.3@24160.87,653.78
RESET: J1.15 R23.2 U1.23 | length 20444
  Top Layer w12: v1(7236,1817) 7465,1817 7503.68,1855.68 26440.32,1855.68 26604,1692 26604,1003.62 v1(26662.75,944.87)
  Bottom Layer w12: J1.15@7086.03,1773.46 7192.46,1773.46 v1(7236,1817) ; v1(26662.75,944.87) U1.23@26715.49,944.87
RXD: J2.4 U1.34 | length 1416.3
  Top Layer w12: v1(26774.19,151.44) 26774.19,996.33 26839.02,1061.17 v1(27214.96,1061.17)
  Bottom Layer w12: J2.4@26773.75,202.26 26773.75,151.88 v1(26774.19,151.44) ; v1@27214.7,1061.43 U1.34@27214.7,1114.17
SPI_A0: J1.10 U1.30 | length 20888.7
  Top Layer w12: v1@7037.6,1675.04 7037.6,1829.2 7102.07,1893.68 26837.32,1893.68 27014.44,1716.56 v1(27014.44,1167.17)
  Bottom Layer w12: v1@7037.6,1675.04 J1.10@7093.12,1675.04 ; U1.30@27014.7,1114.17 v1@27014.7,1166.91
  other v1: 7037.24,1675.4
SPI_CS: J1.9 U1.29 | length 20887.5
  Top Layer w12: v1(7149,1655) 7093.48,1655 7070,1678.48 7070,1829.08 7115.6,1874.68 26813.32,1874.68 26964.44,1723.56 v1(26964.44,1167.17)
  Bottom Layer w12: J1.9@7086.03,1655.36 7148.64,1655.36 v1(7149,1655) ; U1.29@26964.7,1114.17 v1@26964.7,1166.91
SPI_SCL: J1.11 U1.13 | length 21171.4
  Top Layer w12: v1(7149,1695.08) 26401.92,1695.08 26458,1639 26458,369 v1(26544,283)
  Bottom Layer w12: J1.11@7086.03,1694.72 v1@7148.64,1694.72 ; v1(26544,283) 26767,283 26814.7,330.7 U1.13@26814.7,425.19
SPI_SDA: J1.13 U1.14 | length 21096.9
  Top Layer w12: v1(7236,1735) 26399,1735 26486,1648 26486,378 v1(26544,320)
  Bottom Layer w12: J1.13@7086.03,1734.09 7235.09,1734.09 v1(7236,1735) ; v1(26544,320) 26735,320 26764.7,349.7 U1.14@26764.7,425.19
SPI_SDO: J1.14 U1.16 | length 20768.1
  Top Layer w12: v1(7236,1779) 7477,1779 7488,1790 26422,1790 26544,1668 v1(26544,594.61)
  Bottom Layer w12: J1.14@7086.03,1753.78 7210.78,1753.78 v1(7236,1779) ; v1(26544,594.61) U1.16@26715.23,594.61
TXD: J2.3 U1.35 | length 1570.8
  Top Layer w12: v1(26734.82,151.44) 26734.82,592.27 26734.82,1029.96 26819.02,1114.17 27214.7,1114.17 27264.96,1063.91 v1(27264.96,1061.17)
  Bottom Layer w12: J2.3@26734.38,202.26 26734.38,151.88 v1(26734.82,151.44) ; v1@27264.7,1061.43 U1.35@27264.7,1114.17
USB_D_N: J3.A7 J3.B7 U2.5 | length 758.6
  Top Layer w24: 25331.24,196.43 25370.6,235.79 v1(25370.6,285.26) ; v2(25331.23,182) 25331.25,196.42
  Bottom Layer w8: J3.A7@25325.76,242.6 25325.76,187.47 v2(25331.23,182) ; J3.B7@25365.13,242.6 25365.04,242.7 25365.04,279.7 v1(25370.6,285.26)
  Bottom Layer w12: 24941.91,195 24947.91,201 24947.91,242.09 U2.5@24945.12,244.89
  Bottom Layer w24: 24941.91,195 24941.91,157.75 24976.66,123 25293,123 25331.23,161.23 v2(25331.23,182)
USB_D_P: J3.A6 J3.B6 U2.4 | length 758.6
  Top Layer w24: v2(25299.25,183.17) 25299.24,209.69 25338.6,249.05 v1(25338.6,285.26)
  Bottom Layer w8: v2@25306.08,183.17 J3.B6@25306.08,242.6 ; v1(25338.6,285.26) 25339.98,285.26 25345.54,279.7 25345.54,242.7 J3.A6@25345.45,242.6
  Bottom Layer w12: U2.4@24970.71,244.89 24967.91,242.09 24967.91,201 24973.91,195
  Bottom Layer w24: 24973.91,195 24973.91,171 24982.47,162.44 24989.91,155 25024.11,155 ccw(c25024.11,179) 25048.11,179 25048.11,209.64 cw(c25065.11,209.64) 25082.11,209.64 25082.11,179 ccw(c25106.11,179) 25106.11,155 25220.11,155 25279.75,155 25299.23,174.49 v2(25299.25,183.17)
VBUS: C5.2 C13.2 C14.2 C15.2 C16.2 C17.1 C18.2 F1.2 R11.2 U2.2 U4.15 U4.16 U4.17 U4.19
  other v2: 24475,39 24515,39 24555,39 24595,39 24635,39 24675,39 24715,39 24755,39 24795,39 24835,39 24475,69 24515,69 24555,69 24595,69 24635,69 24675,69 24715,69 24755,69 24795,69 24835,69 24475,99 24515,99 24555,99 24595,99 24635,99 24675,99 24715,99 24755,99 24795,99 24835,99 24343,390 24383,390 24423,390 24463,390 24503,390 24543,390 24583,390 24623,390 24663,390 24703,390 24343,420 24383,420 24423,420 24463,420 24503,420 24543,420 24583,420 24623,420 24663,420 24703,420 24343,450 24383,450 24423,450 24463,450 24503,450 24543,450 24583,450 24623,450 24663,450 24703,450
VBUS#: D1.2 F1.1 J3.A4/B9 J3.B4/A9 | length 332.1
  Top Layer w22: v1(25241.02,283) 25241.02,325.02 25262.83,346.83 25409.17,346.83 25430,326 v1(25430,283)
  Bottom Layer w22: v1(25430,283) 25430.09,282.91 J3.A4/B9@25430.09,242.6
pads on no net: J1.1 J1.2 J1.3 J1.4 J1.8 J3.A8 J3.B8 J3.MH LED189.2 SW3.4 SW3.5 SW4.1 U1.4 U1.5 U1.6 U1.7 U1.8 U1.9 U1.12 U1.17 U1.18 U1.19 U1.20 U1.21 U1.22 U1.24 U1.28 U1.31 U1.32 U1.33 U1.36 U1.37 U4.5 U4.18 U4.26

## Polygon pours and split planes (outlines as drawn)
GND on Bottom Layer "GND_L02_P009" (solid, remove dead copper, pour order 9): 0,0 27716.54,0 27716.54,14566.93 0,14566.93
5V on Bottom Layer "5V_L02_P007" (solid, remove dead copper, pour order 7): 24118,561 24118,502 24039,502 24039,383 24005,383 24005,544 24087,544 24087,561
5V on Bottom Layer "5V_L02_P005" (solid, remove dead copper, pour order 5): 26393,1642 26393,1003 24550,1003 24550,1642
VBUS on Bottom Layer "VBUS_L02_P001" (solid, remove dead copper, pour order 1): 24309,0 23654,0 23654,230 24309,230 24309,412.26 24263,412.26 24263,475.81 24197.84,475.81 24186.12,487.53 24186.12,536.26 24198.12,536.26 24198.12,506.26 24219.12,506.26 24219.12,536.26 24696,536.26 24696,601 25135.12,601 25135.12,536.26 25135.12,333.26 25048.12,333.26 25048.12,347.26 24955.12,347.26 24955.12,313.26 24931.12,313.26 24931.12,412.26 24846,412.26 24846,0
3V3 on Bottom Layer "3V3_L02_P004" (solid, remove dead copper, pour order 4): 26535,988 26535,1069 26642,1069 26642,856 26535,856 26535,928 25931,928 25931,857 25874,857 25874,679 25684,679 25684,865 25743,865 25743,988
VBUS# on Bottom Layer "VBUS#_L02_P002" (solid, remove dead copper, pour order 2): 25253.12,218.26 25253.12,294.26 25294.12,294.26 25294.12,394.26 25147.12,394.26 25147.12,291.26 25228.12,291.26 25228.12,218.26
5V on Top Layer "5V_L01_P003" (solid, remove dead copper, pour order 3): 26393,1637 26393,1003 24550,1003 24550,1637
GND on Top Layer "GND_L01_P000" (solid, remove dead copper, pour order 0): 0,0 27716.54,0 27716.54,14566.93 0,14566.93
VBUS on Top Layer "VBUS_L01_P006" (solid, remove dead copper, pour order 6): 24263,412.26 24263,0 24848,0 24848,347.26 24931.12,347.26 24955.12,347.26 25048.12,347.26 25135.12,347.26 25135.12,536.26 24696,536.26 24263,536.26 24263,475.81

## Other copper
Top Layer:
  pour cut-out: 1590,3102.2 1590,661.26 5370.49,661.26 5370.49,3102.2
Bottom Layer:
  rectangle net 3V3: 27394.62,176.26 27427,357
  rectangle net 3V3: 7033,2220 7118,2272
  region net 3V3: 7053.91,2122 7053.91,2271 7026.91,2271 7026.91,2122
  rectangle net 3V3: 7033,2122 7162.5,2134
  rectangle net 3V3: 6974,1590 7174,1622
  rectangle net 3.3V: 26743,1205 26827,1268
  rectangle net NetLED224_1: 26431,83 26531,115
  rectangle net NetC28_1: 24340,718 24376.12,829.26
  rectangle net LED_BRIGHTNESS: 25937,863.26 25991,894
  rectangle net 3V3: 27347,334 27418,357
  rectangle net 3V3: 27347,334 27384,455
  rectangle net LED_K: 7062,2141 7110,2193
  rectangle net NetC6_2: 24962.12,313.26 25030.12,334.26
  rectangle net NetC19_1: 24122.12,1101.26 24144.12,1116.26
  rectangle net NetC19_2: 24204.12,639.26 24313.12,1198.26
  rectangle net 5V: 26710.12,1287.26 26732.12,1309.26
  rectangle net 3V3: 27359.12,176.26 27406.12,206.26
  region net ESP_EN: 27336.12,128.26 27273.12,128.26 27273.12,102.26 27336.12,102.26
  rectangle net ESP_EN: 27314.83,79.36 27351.83,245.26
  rectangle net IO0: 27175.12,100.26 27238.12,126.26
  rectangle net IO0: 27160.12,78.26 27197.12,206.26
  rectangle net LED_BCKL: 26628.12,491.26 26651.12,547.26
  rectangle net DIN#: 26801.12,1168.26 26825.7,1188.26

## Silkscreen, mask and mechanical layers (free items; w line width, h text height)
Bottom Overlay:
  lines w5: 24322.12,510.26 24322.12,320.88 24323,320 ; 26640.12,380 26640.12,448.76 ; 27381,247 27392,258 27489,258 27510,237 27510,214
  text "3V3" at 26484.29,123.92 h60 r270
  text "ENABLE" at 27527,7.1 h60
  text "ON/OFF SWITCH" at 23604.56,6.08 h60
  text "VOLTLINK" at 26896.12,6.08 h60
  text "BOOT" at 27194.98,6.08 h60
Mechanical 1:
  lines w5: 5370.49,661.26 7114.19,661.26 ; 5370.49,683.31 7114.19,683.31 7114.19,1478.19 ; 5370.49,3080.16 7114.19,3080.16 7114.19,2285.28 ; 5370.49,3102.2 7114.19,3102.2 ; 5392.93,711.26 7114.19,711.26 ; 5392.93,3052.2 7114.19,3052.2
Board_outline:
  lines w5: 5440.02,1133.7 5518.76,1133.7 5518.76,3102.2 5440.02,3102.2 5440.02,1133.7
  lines w10: 0,0 27716.54,0 27716.54,14566.93 0,14566.93 0,0
Fabrication Layer:
  drawing of 191 lines, arcs and shapes, not listed
  text "Layer" at 28093.73,14192.44 h213.16
  text "Name" at 29498.95,14192.44 h213.16
  text "Material" at 32750.93,14192.44 h213.16
  text "Thickness" at 35754.31,14192.44 h213.16
  text "Constant" at 38011.87,14192.44 h213.16
  text "Board Layer Stack" at 39985.32,14192.44 h213.16
  text "Top Overlay" at 29498.95,13766.13 h213.16
  text "Top Solder" at 29498.95,13339.81 h213.16
  text "Solder Resist" at 32750.93,13339.81 h213.16
  text "0.39mil" at 35754.31,13339.81 h213.16
  text "3.5" at 38011.87,13339.81 h213.16
  text "1" at 28093.73,12913.5 h213.16
  text "Top Layer" at 29498.95,12913.5 h213.16
  text "1.38mil" at 35754.31,12913.5 h213.16
  text "Dielectric 1" at 29498.95,12487.19 h213.16
  text "FR-4" at 32750.93,12487.19 h213.16
  text "59.06mil" at 35754.31,12487.19 h213.16
  text "4.8" at 38011.87,12487.19 h213.16
  text "2" at 28093.73,12060.87 h213.16
  text "Bottom Layer" at 29498.95,12060.87 h213.16
  text "1.38mil" at 35754.31,12060.87 h213.16
  text "Bottom Solder" at 29498.95,11634.56 h213.16
  text "Solder Resist" at 32750.93,11634.56 h213.16
  text "0.39mil" at 35754.31,11634.56 h213.16
  text "3.5" at 38011.87,11634.56 h213.16
  text "Bottom Overlay" at 29498.95,11208.24 h213.16
  text "Total board thickness:" at 28093.73,10781.93 h213.16
  text "62.60mil" at 35754.31,10781.93 h213.16
  text "NOTE:" at 28120,9905.86 h500
  text "Blind slot is on \"Top_Blind_Slot_Layer\"" at 28119.64,9403.61 h300
  text "Blind slot side = Top" at 28119.64,8815.21 h300
  text "Blind slot size = 96mm x 62mm" at 28119.64,8326.77 h300
  text "Blind slot depth = 0.7mm" at 28119.64,7738.37 h300
  text "Metallization property = Unplated" at 28119.64,7149.97 h300
Mechanical 7:
  drawing of 2281 lines, arcs and shapes, not listed
Top_Blind_Slot_Layer:
  lines w5: 1590.96,661.26 1590.96,3102.2 5370.49,3102.2 5370.49,661.26 1590.96,661.26
Drill Drawing:
  circle w10: c165,17152.27 r68.29
  lines w10: 96.71,16162.11 165,16196.25 233.29,16162.11 199.14,16230.4 233.29,16298.69 165,16264.54 96.71,16298.69 130.86,16230.4 96.71,16162.11 ; 96.71,16503.55 130.86,16503.55 165,16469.4 199.14,16503.55 233.29,16503.55 199.14,16537.69 233.29,16571.83 199.14,16571.83 165,16605.98 130.86,16571.83 96.71,16571.83 130.86,16537.69 96.71,16503.55 ; 96.71,16913.27 233.29,16913.27 165,16776.69 96.71,16913.27 ; 96.71,17391.28 233.29,17391.28 233.29,17527.85 96.71,17527.85 96.71,17391.28
  lines w15: -22.5,16069.92 27182.26,16069.92 ; -22.5,17606.38 27182.26,17606.38 ; 1072.48,15762.63 1072.48,17913.68 ; 2280.35,15762.63 2280.35,17913.68 ; 4512.19,15762.63 4512.19,17913.68 ; 5514.98,15762.63 5514.98,17913.68 ; 6984.7,15762.63 6984.7,17913.68 ; 10035.73,15762.63 10035.73,17913.68 ; 11210.55,15762.63 11210.55,17913.68 ; 12704.84,15762.63 12704.84,17913.68 ; 15018.61,15762.63 15018.61,17913.68 ; 16734.08,15762.63 16734.08,17913.68 ; 19432.57,15762.63 19432.57,17913.68 ; 22131.06,15762.63 22131.06,17913.68 ; 24342.43,15762.63 24342.43,17913.68 ; -22.5,15762.63 27182.26,15762.63 27182.26,17913.68 -22.5,17913.68 -22.5,15762.63
  text "Symbol" at 161.88,17698.57 h147.5
  text "Count" at 1164.66,17698.57 h147.5
  text "Hole Size" at 2372.53,17698.57 h147.5
  text "Plated" at 4604.38,17698.57 h147.5
  text "Hole Type" at 5607.17,17698.57 h147.5
  text "Drill Layer Pair" at 7076.89,17698.57 h147.5
  text "Via/Pad" at 10127.92,17698.57 h147.5
  text "Pad Shape" at 11302.73,17698.57 h147.5
  text "Template" at 12797.03,17698.57 h147.5
  text "Description" at 15110.8,17698.57 h147.5
  text "Hole Tolerance (+)" at 16826.27,17698.57 h147.5
  text "Hole Tolerance (-)" at 19524.76,17698.57 h147.5
  text "Hole Length" at 22223.25,17698.57 h147.5
  text "Routed Path Length" at 24434.62,17698.57 h147.5
  text "2" at 1164.66,17391.28 h122.92
  text "23.62mil (0.600mm)" at 2372.53,17391.28 h122.92
  text "PTH" at 4604.38,17391.28 h122.92
  text "Slot" at 5607.17,17391.28 h122.92
  text "Top Layer - Bottom Layer" at 7076.89,17391.28 h122.92
  text "Pad" at 10127.92,17391.28 h122.92
  text "Rounded" at 11302.73,17391.28 h122.92
  text "r90_170h60_140r100" at 12797.03,17391.28 h122.92
  text "55.12mil (1.400mm)" at 22223.25,17391.28 h122.92
  text "31.50mil (0.800mm)" at 24434.62,17391.28 h122.92
  text "2" at 1164.66,17083.99 h122.92
  text "23.62mil (0.600mm)" at 2372.53,17083.99 h122.92
  text "PTH" at 4604.38,17083.99 h122.92
  text "Slot" at 5607.17,17083.99 h122.92
  text "Top Layer - Bottom Layer" at 7076.89,17083.99 h122.92
  text "Pad" at 10127.92,17083.99 h122.92
  text "Rounded" at 11302.73,17083.99 h122.92
  text "(Mixed)" at 12797.03,17083.99 h122.92
  text "66.93mil (1.700mm)" at 22223.25,17083.99 h122.92
  text "43.31mil (1.100mm)" at 24434.62,17083.99 h122.92
  text "2" at 1164.66,16776.69 h122.92
  text "24.41mil (0.620mm)" at 2372.53,16776.69 h122.92
  text "NPTH" at 4604.38,16776.69 h122.92
  text "Round" at 5607.17,16776.69 h122.92
  text "Top Layer - Bottom Layer" at 7076.89,16776.69 h122.92
  text "Pad" at 10127.92,16776.69 h122.92
  text "Rounded" at 11302.73,16776.69 h122.92
  text "c0hn62" at 12797.03,16776.69 h122.92
  text "-" at 22223.25,16776.69 h122.92
  text "-" at 24434.62,16776.69 h122.92
  text "5" at 1164.66,16469.4 h122.92
  text "74.80mil (1.900mm)" at 2372.53,16469.4 h122.92
  text "PTH" at 4604.38,16469.4 h122.92
  text "Round" at 5607.17,16469.4 h122.92
  text "Top Layer - Bottom Layer" at 7076.89,16469.4 h122.92
  text "Pad" at 10127.92,16469.4 h122.92
  text "Rounded" at 11302.73,16469.4 h122.92
  text "(Mixed)" at 12797.03,16469.4 h122.92
  text "-" at 22223.25,16469.4 h122.92
  text "-" at 24434.62,16469.4 h122.92
  text "971" at 1164.66,16162.11 h122.92
  text "11.81mil (0.300mm)" at 2372.53,16162.11 h122.92
  text "PTH" at 4604.38,16162.11 h122.92
  text "Round" at 5607.17,16162.11 h122.92
  text "Top Layer - Bottom Layer" at 7076.89,16162.11 h122.92
  text "(Mixed)" at 10127.92,16162.11 h122.92
  text "Rounded" at 11302.73,16162.11 h122.92
  text "(Mixed)" at 12797.03,16162.11 h122.92
  text "-" at 22223.25,16162.11 h122.92
  text "-" at 24434.62,16162.11 h122.92
  text "982 Total" at 1164.66,15854.82 h122.92
  text "Slot definitions :" at 161.88,15578.8 h122.92
  text "Routed Path Length" at 2248.1,15578.8 h122.92
  text "= Calculated from tool start centre position to tool end centre position." at 4477.67,15578.8 h122.92
  text "Hole Length" at 2248.1,15394.96 h122.92
  text "= Routed Path Length + Tool Size = Slot length as defined in the PCB layout" at 3638.01,15394.96 h122.92

## Dimensions
7114.19,2285.28 to 7114.19,1478.19 on Mechanical 1
0,14566.93 to 0,0 on Mechanical 1
0,14566.93 to 27716.54,14566.93 on Mechanical 1

## Text inside footprints (layer, text, board x,y; h text height)
J1: Bottom Overlay "1" at 7030.78,1495.09 h19.68 r270
J3: Bottom Overlay "PCB Edge" at 25388.29,31.06 h31.5